# Altium PCB CH32H417QEU-R1.PcbDoc (part 5 of 6)
Units mil, origin at the board's own origin, x right, y up, seen from the top; angles counter-clockwise.
Board outline 4921.26 x 3346.46 mil, 4 copper layers (Top Layer, Layer 1, Layer 2, Bottom Layer), stack 23.756 mil thick; 271 components, 257 nets, 1065 pads, 927 vias.
Unrouted connection lines stored in the file: 149.
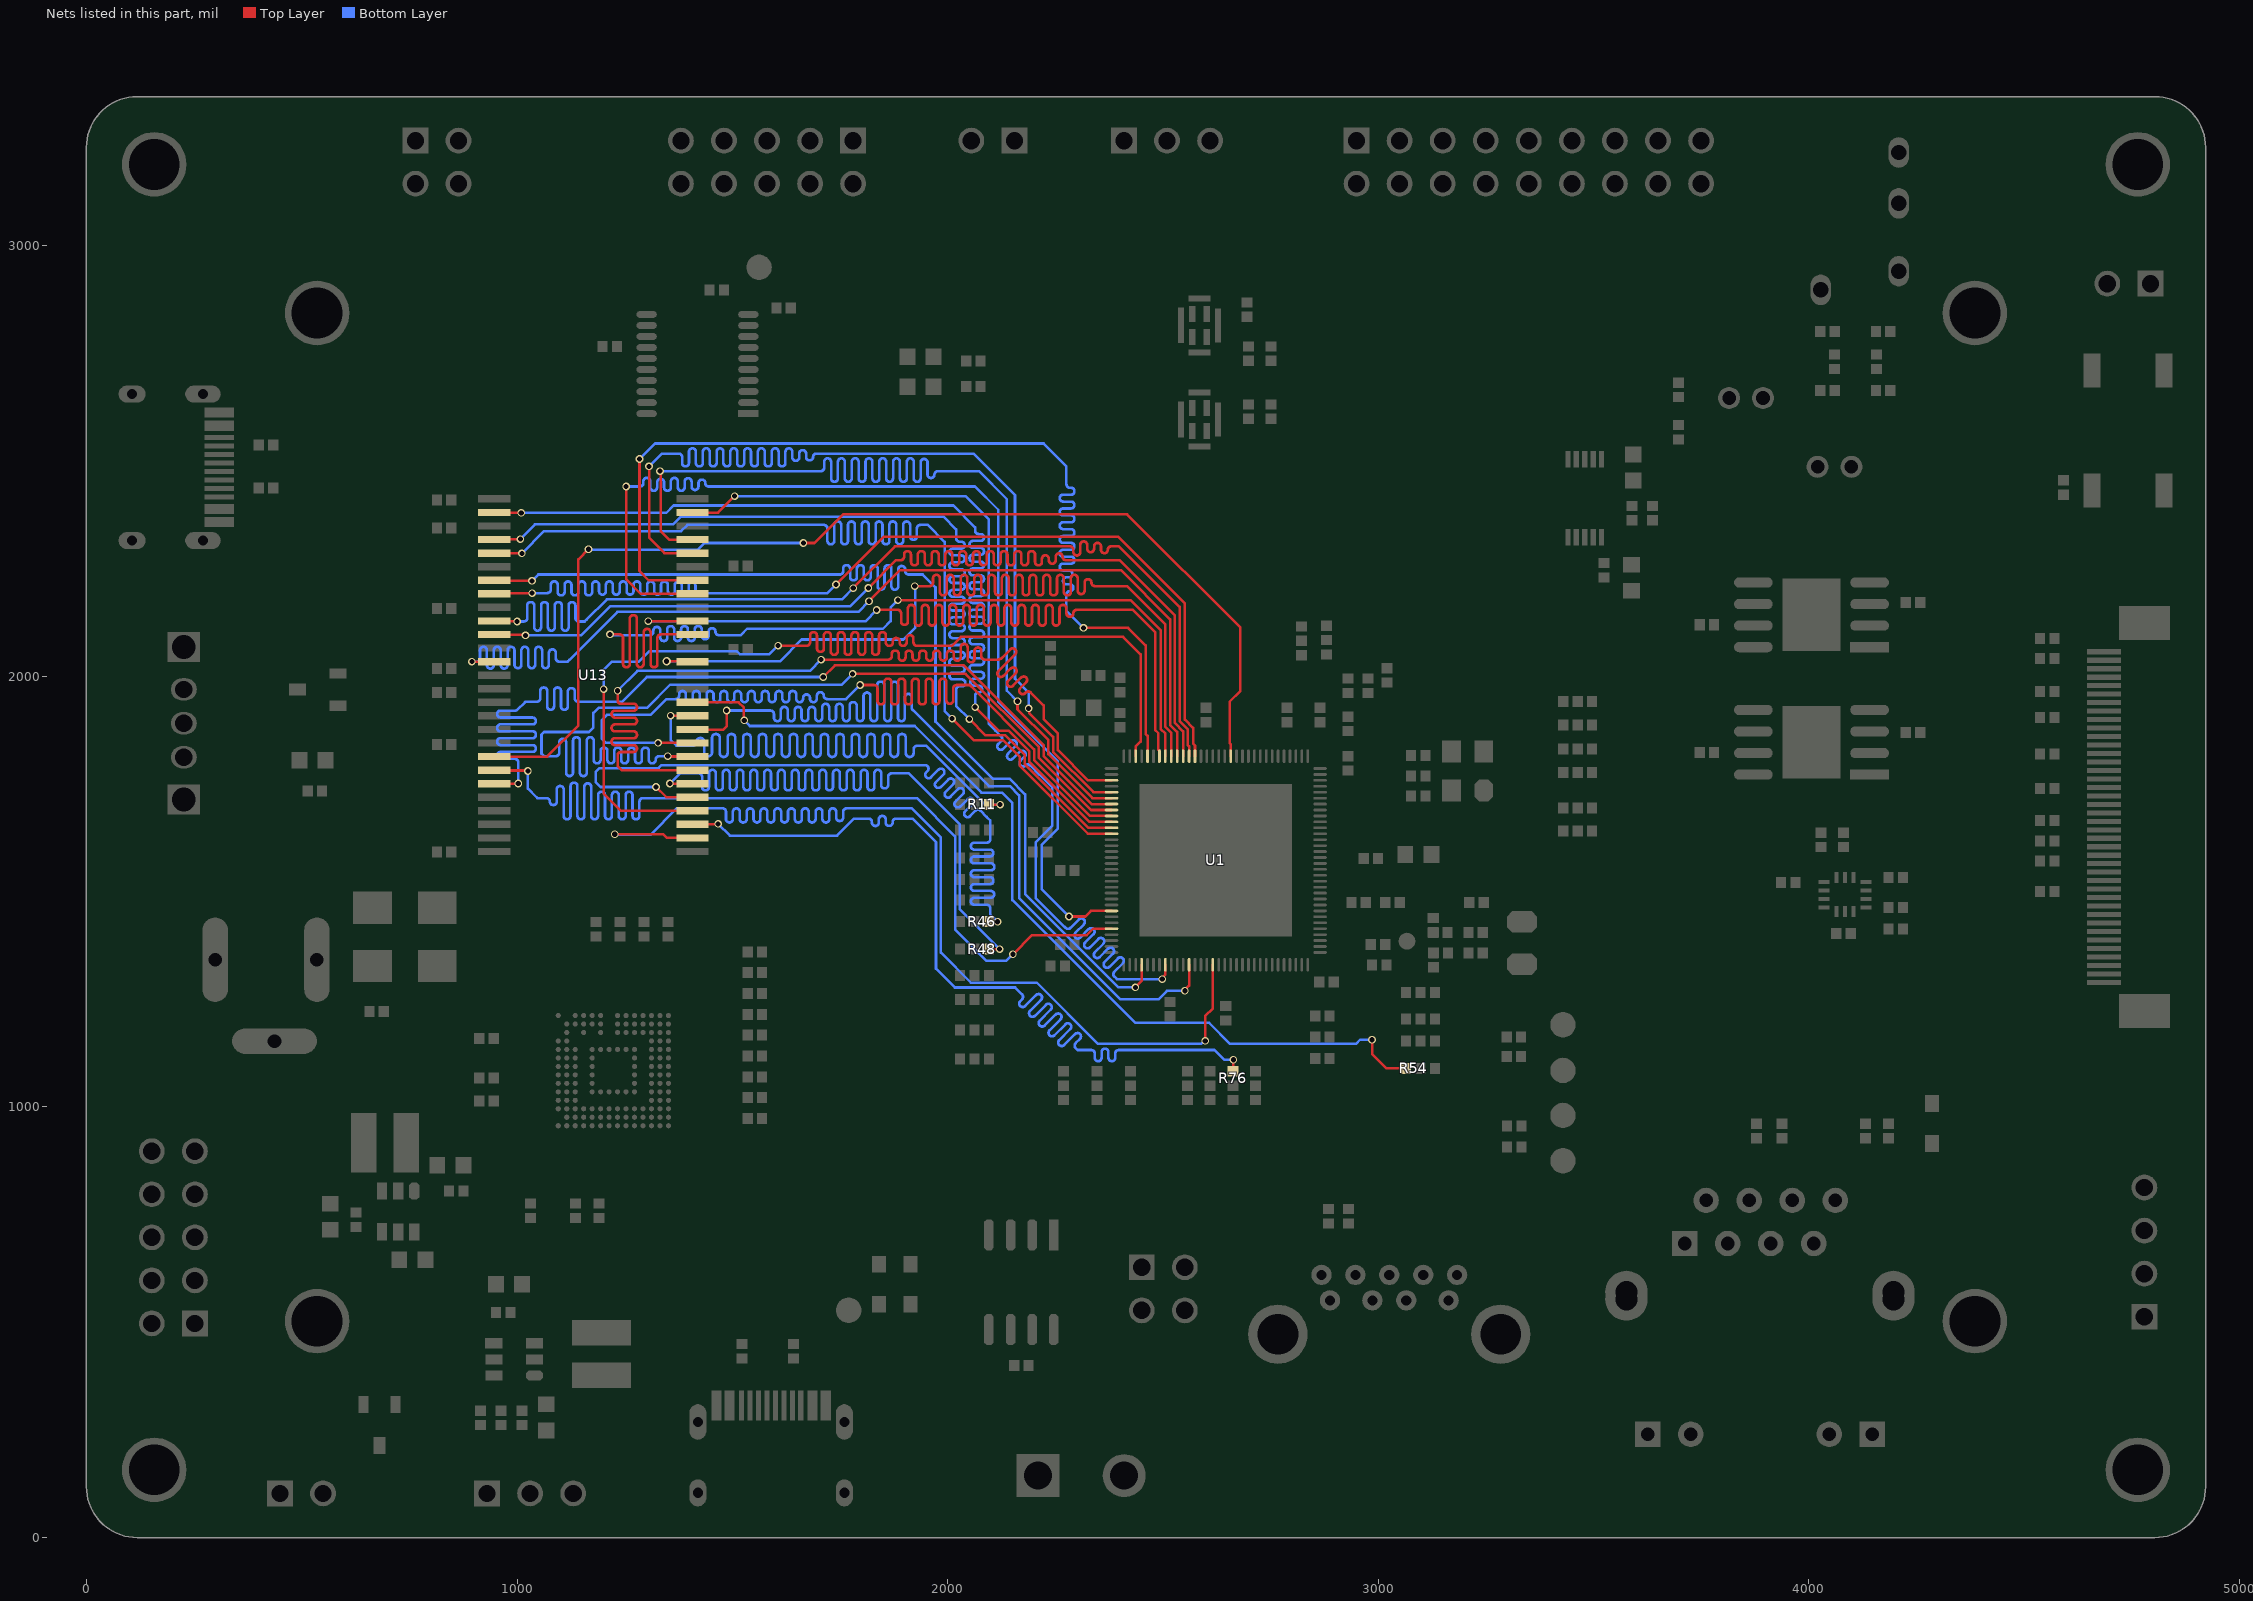
[diagram p7: the nets of this part, all layers, seen from the top]

## Via types
v1: diameter 17.72, hole 11.81, Top Layer to Bottom Layer, tented both sides, 558 vias
v2: diameter 19.68, hole 11.81, Top Layer to Bottom Layer, tented both sides, 320 vias
v3: diameter 28, hole 16, Top Layer to Bottom Layer, tented both sides, 24 vias
v4: diameter 20, hole 12, Top Layer to Bottom Layer, tented both sides, 22 vias
v5: diameter 27.56, hole 15.75, Top Layer to Bottom Layer, tented both sides, 3 vias

## Nets (pads, with @x,y where several pads share a name; then routed paths per layer and width w, separated by ;. In a path a pad name is that pad's centre, name@x,y a point inside that pad or via, vN(x,y) a via of type N, cw(c..) or ccw(c..) an arc to the next point about the centre after c; other vN are vias at no path point) (continued)
SDRAM_A4: U1.112 U13.29 | length 2610.3
  Top Layer w6: v1(1226.94,1633.39) 1227.31,1633.02 1339.76,1633.02 1347.96,1624.81 U13.29@1407.4,1624.81 ; v1(2598.17,1153.73) 2598.17,1211.58 2615.8,1229.21 U1.112@2615.8,1330.38
  Bottom Layer w6: v1(1226.94,1633.39) 1228.27,1632.06 1309.51,1632.06 1370.85,1693.4 1458.25,1693.4 1477.25,1693.4 cw(c1477.25,1685.4) 1485.25,1685.4 1485.25,1668.66 ccw(c1493.25,1668.66) 1501.25,1668.66 1501.25,1685.4 cw(c1509.25,1685.4) 1517.25,1685.4 1517.25,1668.66 ccw(c1525.25,1668.66) 1533.25,1668.66 1533.25,1685.4 cw(c1541.25,1685.4) 1549.25,1685.4 1549.25,1668.66 ccw(c1557.25,1668.66) 1565.25,1668.66 1565.25,1685.4 cw(c1573.25,1685.4) 1581.25,1685.4 1581.25,1668.66 ccw(c1589.25,1668.66) 1597.25,1668.66 1597.25,1685.4 cw(c1605.25,1685.4) 1613.25,1685.4 1613.25,1668.66 ccw(c1621.25,1668.66) 1629.25,1668.66 1629.25,1685.4 cw(c1637.25,1685.4) 1645.25,1685.4 1645.25,1668.66 ccw(c1653.25,1668.66) 1661.25,1668.66 1661.25,1685.4 cw(c1669.25,1685.4) 1677.25,1685.4 1677.25,1668.66 ccw(c1685.25,1668.66) 1693.25,1668.66 1693.25,1685.4 cw(c1701.25,1685.4) 1709.25,1685.4 1709.25,1668.66 ccw(c1717.25,1668.66) 1725.25,1668.66 1725.25,1685.4 cw(c1733.25,1685.4) 1741.25,1685.4 1741.25,1672.09 ccw(c1749.25,1672.09) 1757.25,1672.09 1757.25,1685.4 cw(c1765.25,1685.4) 1765.25,1693.4 1793.54,1693.4 1916.83,1693.4 1984.05,1626.18 1984.05,1358.53 2054.06,1288.52 2207.12,1288.52 2349.19,1146.46 2588.8,1146.46 2596.07,1153.73 v1(2598.17,1153.73)
SDRAM_A5: R76.1 U13.30 | length 2296
  Top Layer w6: U13.30@1407.4,1656.31 1408.03,1656.94 1466.48,1656.94 v1(1467.11,1657.58) ; R76.1@2662.33,1082.95 2663.58,1084.19 v1(2663.58,1109.78)
  Bottom Layer w6: v1(1467.11,1657.58) 1494.68,1630.01 1743.26,1630.01 1782.84,1669.59 1797.2,1669.59 1816.2,1669.59 cw(c1816.2,1661.59) 1824.2,1661.59 1824.2,1660.53 ccw(c1832.2,1660.53) 1840.2,1660.53 1840.2,1667.9 cw(c1848.2,1667.9) 1856.2,1667.9 1856.2,1660.78 ccw(c1864.2,1660.78) 1872.2,1660.78 1872.2,1661.59 cw(c1880.2,1661.59) 1880.2,1669.59 1901.49,1669.59 1918.54,1669.59 1973.05,1615.07 1973.05,1321.32 2016.85,1277.52 2122.66,1277.52 2156.57,1277.52 2172.85,1261.24 cw(c2167.19,1255.59) 2172.85,1249.93 2168.71,1245.8 ccw(c2174.37,1240.14) 2168.71,1234.48 ccw(c2174.37,1240.14) 2180.03,1234.48 2205.51,1259.97 cw(c2211.17,1254.31) 2216.82,1259.97 cw(c2211.17,1254.31) 2216.82,1248.65 2191.34,1223.17 ccw(c2197,1217.51) 2191.34,1211.86 ccw(c2197,1217.51) 2202.65,1211.86 2228.14,1237.34 cw(c2233.8,1231.68) 2239.45,1237.34 cw(c2233.8,1231.68) 2239.45,1226.03 2213.97,1200.54 ccw(c2219.63,1194.88) 2213.97,1189.23 ccw(c2219.63,1194.88) 2225.28,1189.23 2250.77,1214.71 cw(c2256.42,1209.05) 2262.08,1214.71 cw(c2256.42,1209.05) 2262.08,1203.4 2236.6,1177.91 ccw(c2242.25,1172.26) 2236.6,1166.6 ccw(c2242.25,1172.26) 2247.91,1166.6 2273.39,1192.08 cw(c2279.05,1186.43) 2284.71,1192.08 cw(c2279.05,1186.43) 2284.71,1180.77 2259.22,1155.29 ccw(c2264.88,1149.63) 2259.22,1143.97 ccw(c2264.88,1149.63) 2270.54,1143.97 2296.02,1169.46 cw(c2301.68,1163.8) 2307.33,1169.46 cw(c2301.68,1163.8) 2307.33,1158.14 2297.3,1148.11 ccw(c2302.95,1142.45) 2297.3,1136.79 2301.81,1132.28 2314.43,1132.28 2333.43,1132.28 cw(c2333.43,1124.28) 2341.43,1124.28 2341.43,1114.39 ccw(c2349.43,1114.39) 2357.43,1114.39 2357.43,1127.46 cw(c2365.43,1127.46) 2373.43,1127.46 2373.43,1114.39 ccw(c2381.43,1114.39) 2389.43,1114.39 2389.43,1124.28 cw(c2397.43,1124.28) 2397.43,1132.28 2447.67,1132.28 2619.47,1132.28 2641.97,1109.78 v1(2663.58,1109.78)
SDRAM_A6: U1.62 U13.31 | length 2608
  Top Layer w6: v1(1201.03,1970.49) 1201.03,1727.88 1241.11,1687.81 U13.31@1407.4,1687.81 ; v1(1606.5,2071.41) 1606.93,2070.98 1669.59,2070.98 1672.6,2070.98 ccw(c1672.6,2078.98) 1680.6,2078.98 1680.6,2094.79 cw(c1688.6,2094.79) 1696.6,2094.79 1696.6,2064.83 ccw(c1704.6,2064.83) 1712.6,2064.83 1712.6,2094.79 cw(c1720.6,2094.79) 1728.6,2094.79 1728.6,2057.98 ccw(c1736.6,2057.98) 1744.6,2057.98 1744.6,2094.79 cw(c1752.6,2094.79) 1760.6,2094.79 1760.6,2057.98 ccw(c1768.6,2057.98) 1776.6,2057.98 1776.6,2094.79 cw(c1784.6,2094.79) 1792.6,2094.79 1792.6,2057.98 ccw(c1800.6,2057.98) 1808.6,2057.98 1808.6,2094.79 cw(c1816.6,2094.79) 1824.6,2094.79 1824.6,2057.98 ccw(c1832.6,2057.98) 1840.6,2057.98 1840.6,2094.79 cw(c1848.6,2094.79) 1856.6,2094.79 1856.6,2078.71 ccw(c1864.6,2078.71) 1872.6,2078.71 1872.6,2081.11 cw(c1880.6,2081.11) 1888.6,2081.11 1888.6,2078.71 ccw(c1896.6,2078.71) 1904.6,2078.71 1904.6,2087.96 cw(c1912.6,2087.96) 1920.6,2087.96 1920.6,2078.98 ccw(c1928.6,2078.98) 1928.6,2070.98 1965.57,2070.98 2010.37,2070.98 2030.95,2091.56 2407.16,2091.56 2448.02,2050.7 2448.02,1848.38 2436.67,1837.03 U1.62@2436.67,1814.64
  Bottom Layer w6: v1(1201.03,1970.49) 1201.03,2015 1220.07,2034.04 1283.01,2034.04 1307.71,2058.74 1510.18,2058.74 1517.23,2051.69 1586.16,2051.69 v1@1606.19,2071.72
SDRAM_A7: R46.1 U13.32 | length 2255.1
  Top Layer w6: v1(1322.85,1743.16) 1346.7,1719.3 U13.32@1407.4,1719.3 ; R46.1@2095.96,1430.46 2096.23,1430.19 v1(2116.23,1430.19)
  Bottom Layer w6: v1(1322.85,1743.16) 1193.84,1743.16 1182.96,1754.04 1182.96,1778.55 1191.46,1787.05 1328.74,1787.05 1335.61,1793.93 1934.4,1793.93 1947.61,1793.93 cw(c1947.61,1785.93) 1953.27,1780.27 1950.16,1777.16 ccw(c1955.81,1771.5) 1950.16,1765.85 ccw(c1955.81,1771.5) 1961.47,1765.84 1978.94,1783.31 cw(c1984.59,1777.66) 1990.25,1783.31 cw(c1984.6,1777.65) 1990.25,1772 1972.79,1754.53 ccw(c1978.44,1748.87) 1972.79,1743.22 ccw(c1978.44,1748.87) 1984.1,1743.22 2001.57,1760.68 cw(c2007.22,1755.03) 2012.88,1760.68 cw(c2007.22,1755.03) 2012.88,1749.37 1995.41,1731.9 ccw(c2001.07,1726.25) 1995.41,1720.59 ccw(c2001.07,1726.25) 2006.73,1720.59 2024.19,1738.06 cw(c2029.85,1732.4) 2035.51,1738.06 cw(c2029.85,1732.4) 2035.51,1726.74 2018.04,1709.28 ccw(c2023.7,1703.62) 2018.04,1697.96 ccw(c2023.7,1703.62) 2029.35,1697.96 2046.82,1715.43 cw(c2052.48,1709.77) 2058.13,1715.43 cw(c2052.48,1709.77) 2058.13,1704.12 2040.67,1686.65 ccw(c2046.32,1680.99) 2040.67,1675.34 ccw(c2046.32,1680.99) 2051.98,1675.34 2064.9,1688.25 cw(c2070.55,1682.6) 2076.21,1688.25 2090.54,1673.92 2098.96,1665.5 2098.96,1640.73 2098.96,1621.73 cw(c2090.96,1621.73) 2090.96,1613.73 2061.96,1613.73 ccw(c2061.96,1605.73) 2061.96,1597.73 2098.13,1597.73 cw(c2098.13,1589.73) 2098.13,1581.73 2061.96,1581.73 ccw(c2061.96,1573.73) 2061.96,1565.73 2100.51,1565.73 cw(c2100.51,1557.73) 2100.51,1549.73 2061.96,1549.73 ccw(c2061.96,1541.73) 2061.96,1533.73 2098.39,1533.73 cw(c2098.39,1525.73) 2098.39,1517.73 2061.96,1517.73 ccw(c2061.96,1509.73) 2061.96,1501.73 2100.1,1501.73 cw(c2100.1,1493.73) 2100.1,1485.73 2061.96,1485.73 ccw(c2061.96,1477.73) 2061.96,1469.73 2090.96,1469.73 cw(c2090.96,1461.73) 2098.96,1461.73 2098.96,1447.46 2109.92,1436.5 v1(2116.23,1430.19)
SDRAM_A8: R48.1 U13.33 | length 2255.4
  Top Layer w6: v1(1354.89,1751.08) 1355.03,1750.94 1407.26,1750.94 U13.33@1407.4,1750.8 ; R48.1@2095.96,1366.35 2096.04,1366.42 v1(2120.82,1366.42)
  Bottom Layer w6: v1(1354.89,1751.08) 1378.46,1774.64 1402.8,1774.64 1421.8,1774.64 cw(c1421.8,1766.64) 1429.8,1766.64 1429.8,1743.24 ccw(c1437.8,1743.24) 1445.8,1743.24 1445.8,1774.93 cw(c1453.8,1774.93) 1461.8,1774.93 1461.8,1743.24 ccw(c1469.8,1743.24) 1477.8,1743.24 1477.8,1774.93 cw(c1485.8,1774.93) 1493.8,1774.93 1493.8,1743.24 ccw(c1501.8,1743.24) 1509.8,1743.24 1509.8,1774.93 cw(c1517.8,1774.93) 1525.8,1774.93 1525.8,1743.24 ccw(c1533.8,1743.24) 1541.8,1743.24 1541.8,1774.93 cw(c1549.8,1774.93) 1557.8,1774.93 1557.8,1743.24 ccw(c1565.8,1743.24) 1573.8,1743.24 1573.8,1774.93 cw(c1581.8,1774.93) 1589.8,1774.93 1589.8,1743.24 ccw(c1597.8,1743.24) 1605.8,1743.24 1605.8,1774.93 cw(c1613.8,1774.93) 1621.8,1774.93 1621.8,1743.24 ccw(c1629.8,1743.24) 1637.8,1743.24 1637.8,1774.93 cw(c1645.8,1774.93) 1653.8,1774.93 1653.8,1743.24 ccw(c1661.8,1743.24) 1669.8,1743.24 1669.8,1774.93 cw(c1677.8,1774.93) 1685.8,1774.93 1685.8,1743.24 ccw(c1693.8,1743.24) 1701.8,1743.24 1701.8,1774.93 cw(c1709.8,1774.93) 1717.8,1774.93 1717.8,1743.24 ccw(c1725.8,1743.24) 1733.8,1743.24 1733.8,1774.93 cw(c1741.8,1774.93) 1749.8,1774.93 1749.8,1743.24 ccw(c1757.8,1743.24) 1765.8,1743.24 1765.8,1774.93 cw(c1773.8,1774.93) 1781.8,1774.93 1781.8,1743.24 ccw(c1789.8,1743.24) 1797.8,1743.24 1797.8,1774.93 cw(c1805.8,1774.93) 1813.8,1774.93 1813.8,1743.24 ccw(c1821.8,1743.24) 1829.8,1743.24 1829.8,1774.93 cw(c1837.8,1774.93) 1845.8,1774.93 1845.8,1747.75 ccw(c1853.8,1747.75) 1861.8,1747.75 1861.8,1766.64 cw(c1869.8,1766.64) 1869.8,1774.64 1884.13,1774.64 1910.02,1774.64 2028.4,1656.26 2028.4,1458.76 2120.74,1366.42 v1(2120.82,1366.42)
SDRAM_A9: U1.67 U13.34 | length 2605.3
  Top Layer w6: v1(1233.56,1966.62) 1233.56,1958.16 1233.56,1944.38 ccw(c1241.56,1944.38) 1241.56,1936.38 1270.56,1936.38 cw(c1270.56,1928.38) 1270.56,1920.38 1227.44,1920.38 ccw(c1227.44,1912.38) 1227.44,1904.38 1270.56,1904.38 cw(c1270.56,1896.38) 1270.56,1888.38 1227.44,1888.38 ccw(c1227.44,1880.38) 1227.44,1872.38 1270.56,1872.38 cw(c1270.56,1864.38) 1270.56,1856.38 1227.44,1856.38 ccw(c1227.44,1848.38) 1227.44,1840.38 1270.56,1840.38 cw(c1270.56,1832.38) 1270.56,1824.38 1241.56,1824.38 ccw(c1241.56,1816.38) 1233.56,1816.38 1233.56,1797.38 1233.56,1791.54 1242.88,1782.21 U13.34@1407.4,1782.21 ; v1(1706.29,2038.98) 1859.3,2038.98 1862.3,2038.98 ccw(c1862.3,2046.98) 1870.3,2046.98 1870.3,2051.98 cw(c1878.3,2051.98) 1886.3,2051.98 1886.3,2044.46 ccw(c1894.3,2044.46) 1902.3,2044.46 1902.3,2051.98 cw(c1910.3,2051.98) 1918.3,2051.98 1918.3,2044.46 ccw(c1926.3,2044.46) 1934.3,2044.46 1934.3,2051.98 cw(c1942.3,2051.98) 1950.3,2051.98 1950.3,2044.46 ccw(c1958.3,2044.46) 1966.3,2044.46 1966.3,2051.98 cw(c1974.3,2051.98) 1982.3,2051.98 1982.3,2044.46 ccw(c1990.3,2044.46) 1998.3,2044.46 1998.3,2051.98 cw(c2006.3,2051.98) 2014.3,2051.98 2014.3,2044.46 ccw(c2022.3,2044.46) 2030.3,2044.46 2030.3,2067.35 cw(c2038.3,2067.35) 2046.3,2067.35 2046.3,2040.29 ccw(c2054.3,2040.29) 2062.3,2040.29 2062.3,2058.99 cw(c2070.3,2058.99) 2078.3,2058.99 2078.3,2046.98 ccw(c2086.3,2046.98) 2086.3,2038.98 2101.63,2038.98 2112.12,2038.98 2116.36,2038.98 ccw(c2116.36,2052.63) 2126,2042.96 2145.83,2062.79 cw(c2151.49,2057.13) 2157.15,2062.79 cw(c2151.49,2057.13) 2157.15,2051.47 2117.91,2012.24 ccw(c2123.57,2006.58) 2117.91,2000.93 ccw(c2123.57,2006.58) 2129.23,2000.93 2146.5,2018.2 cw(c2152.16,2012.55) 2157.82,2018.2 cw(c2152.16,2012.55) 2157.82,2006.89 2140.54,1989.61 ccw(c2146.2,1983.95) 2140.54,1978.3 ccw(c2146.2,1983.95) 2151.85,1978.3 2170.87,1997.32 cw(c2176.53,1991.66) 2182.19,1997.32 cw(c2176.53,1991.66) 2182.19,1986 2168.57,1972.39 ccw(c2174.23,1966.73) 2168.57,1961.07 ccw(c2174.23,1966.73) 2179.88,1961.07 2181.53,1962.72 cw(c2187.19,1957.07) 2192.85,1962.72 2222.79,1932.78 2222.79,1900.65 2255.84,1867.6 2255.84,1828.86 2326.16,1758.53 U1.67@2380.56,1758.53
  Bottom Layer w6: v1(1233.56,1966.62) 1279.69,2012.75 1680.07,2012.75 v1(1706.29,2038.98)
SDRAM_A10: U1.71 U13.22 | length 2610.4
  Top Layer w6: U13.22@947.4,1750.8 947.56,1750.96 1002.6,1750.96 v1(1002.77,1751.13) ; v1(1711.13,1998.51) 1738.08,2025.46 2037.57,2025.46 2222.84,1840.19 2222.84,1815.19 2334.61,1703.42 U1.71@2380.56,1703.42
  Bottom Layer w6: v1(1002.77,1751.13) 1002.77,1797.5 1002.77,1800.5 ccw(c994.77,1800.5) 994.77,1808.5 961.79,1808.5 cw(c961.79,1816.5) 961.79,1824.5 1035.79,1824.5 ccw(c1035.79,1832.5) 1035.79,1840.5 961.79,1840.5 cw(c961.79,1848.5) 961.79,1856.5 1035.79,1856.5 ccw(c1035.79,1864.5) 1035.79,1872.5 961.79,1872.5 cw(c961.79,1880.5) 961.79,1888.5 1035.79,1888.5 ccw(c1035.79,1896.5) 1035.79,1904.5 961.79,1904.5 cw(c961.79,1912.5) 961.79,1920.5 995.35,1920.5 ccw(c995.35,1928.5) 1001.01,1922.85 1018,1939.84 1019.06,1940.9 1043.07,1940.9 1046.07,1940.9 ccw(c1046.07,1948.9) 1054.07,1948.9 1054.07,1966.26 cw(c1062.07,1966.26) 1070.07,1966.26 1070.07,1930.4 ccw(c1078.07,1930.4) 1086.07,1930.4 1086.07,1966.26 cw(c1094.07,1966.26) 1102.07,1966.26 1102.07,1930.4 ccw(c1110.07,1930.4) 1118.07,1930.4 1118.07,1964.79 cw(c1126.07,1964.79) 1134.07,1964.79 1134.07,1948.9 ccw(c1142.07,1948.9) 1142.07,1940.9 1176.25,1940.9 1243.78,1940.9 1301.39,1998.51 v1(1711.13,1998.51)
SDRAM_A11: U1.72 U13.35 | length 2609.6
  Top Layer w6: v1@1350.06,1813.91 U13.35@1407.52,1813.91 ; v1(1779.4,2005.88) 2041.58,2005.88 2211.84,1835.61 2211.84,1810.63 2332.84,1689.64 U1.72@2380.56,1689.64
  Bottom Layer w6: v1(1350.06,1814.72) 1332.99,1814.72 1329.99,1814.72 ccw(c1329.99,1806.72) 1321.99,1806.72 1321.99,1806.05 cw(c1313.99,1806.05) 1305.99,1806.05 1305.99,1826.58 ccw(c1297.99,1826.58) 1289.99,1826.58 1289.99,1806.05 cw(c1281.99,1806.05) 1273.99,1806.05 1273.99,1826.58 ccw(c1265.99,1826.58) 1257.99,1826.58 1257.99,1806.05 cw(c1249.99,1806.05) 1241.99,1806.05 1241.99,1826.58 ccw(c1233.99,1826.58) 1225.99,1826.58 1225.99,1806.05 cw(c1217.99,1806.05) 1209.99,1806.05 1209.99,1826.58 ccw(c1201.99,1826.58) 1193.99,1826.58 1193.99,1806.05 cw(c1185.99,1806.05) 1177.99,1806.05 1177.99,1850.79 ccw(c1169.99,1850.79) 1161.99,1850.79 1161.99,1776.45 cw(c1153.99,1776.45) 1145.99,1776.45 1145.99,1850.79 ccw(c1137.99,1850.79) 1129.99,1850.79 1129.99,1776.45 cw(c1121.99,1776.45) 1113.99,1776.45 1113.99,1847.14 ccw(c1105.99,1847.14) 1097.99,1847.14 1097.99,1822.72 cw(c1089.99,1822.72) 1089.99,1814.72 1065.02,1814.72 1062.71,1814.72 1056.92,1820.5 1056.92,1864.73 1062.98,1870.79 1167.21,1870.79 1177.5,1881.08 1177.5,1915.01 1189.98,1927.49 1302.7,1927.49 1355.85,1980.65 1754.17,1980.65 v1(1779.4,2005.88)
SDRAM_A12: U1.73 U13.36 | length 2605.3
  Top Layer w6: v1(1327.73,1845.58) 1327.88,1845.43 1407.25,1845.43 U13.36@1407.4,1845.29 ; v1(1796.82,1979.93) 1810.04,1979.93 1829.04,1979.93 cw(c1829.04,1971.93) 1837.04,1971.93 1837.04,1942.93 ccw(c1845.04,1942.93) 1853.04,1942.93 1853.04,1986.88 cw(c1861.04,1986.88) 1869.04,1986.88 1869.04,1942.93 ccw(c1877.04,1942.93) 1885.04,1942.93 1885.04,1986.88 cw(c1893.04,1986.88) 1901.04,1986.88 1901.04,1942.93 ccw(c1909.04,1942.93) 1917.04,1942.93 1917.04,1986.88 cw(c1925.04,1986.88) 1933.04,1986.88 1933.04,1942.93 ccw(c1941.04,1942.93) 1949.04,1942.93 1949.04,1986.88 cw(c1957.04,1986.88) 1965.04,1986.88 1965.04,1942.93 ccw(c1973.04,1942.93) 1981.04,1942.93 1981.04,1986.88 cw(c1989.04,1986.88) 1997.04,1986.88 1997.04,1944.32 ccw(c2005.04,1944.32) 2013.04,1944.32 2013.04,1971.93 cw(c2021.04,1971.93) 2021.04,1979.93 2051.44,1979.93 2054.12,1977.25 2200.84,1830.53 2200.84,1806.08 2331.06,1675.86 U1.73@2380.56,1675.86
  Bottom Layer w6: v1(1327.73,1845.58) 1206.44,1845.58 1196.32,1855.7 1196.32,1897.82 1209.04,1910.54 1309.89,1910.54 1346.66,1947.31 1365.28,1947.31 1368.28,1947.31 ccw(c1368.28,1955.31) 1376.28,1955.31 1376.28,1958.13 cw(c1384.28,1958.13) 1392.28,1958.13 1392.28,1948.13 ccw(c1400.28,1948.13) 1408.28,1948.13 1408.28,1958.13 cw(c1416.28,1958.13) 1424.28,1958.13 1424.28,1948.13 ccw(c1432.28,1948.13) 1440.28,1948.13 1440.28,1958.13 cw(c1448.28,1958.13) 1456.28,1958.13 1456.28,1948.13 ccw(c1464.28,1948.13) 1472.28,1948.13 1472.28,1958.13 cw(c1480.28,1958.13) 1488.28,1958.13 1488.28,1948.13 ccw(c1496.28,1948.13) 1504.28,1948.13 1504.28,1958.13 cw(c1512.28,1958.13) 1520.28,1958.13 1520.28,1948.13 ccw(c1528.28,1948.13) 1536.28,1948.13 1536.28,1958.13 cw(c1544.28,1958.13) 1552.28,1958.13 1552.28,1948.13 ccw(c1560.28,1948.13) 1568.28,1948.13 1568.28,1958.13 cw(c1576.28,1958.13) 1584.28,1958.13 1584.28,1948.13 ccw(c1592.28,1948.13) 1600.28,1948.13 1600.28,1958.13 cw(c1608.28,1958.13) 1616.28,1958.13 1616.28,1948.13 ccw(c1624.28,1948.13) 1632.28,1948.13 1632.28,1958.13 cw(c1640.28,1958.13) 1648.28,1958.13 1648.28,1948.13 ccw(c1656.28,1948.13) 1664.28,1948.13 1664.28,1950.12 cw(c1672.28,1950.12) 1680.28,1950.12 1680.28,1948.13 ccw(c1688.28,1948.13) 1696.28,1948.13 1696.28,1955.31 cw(c1704.28,1955.31) 1712.28,1955.31 ccw(c1720.28,1955.31) 1720.28,1947.31 1737.22,1947.31 1764.21,1947.31 v1(1796.82,1979.93)
SDRAM_BA0: U1.46 U13.20 | length 2610.6
  Top Layer w6: U13.20@947.4,1813.79 1070.1,1813.79 1142.28,1885.97 1142.28,2271.45 v1(1166.07,2295.24) ; v1(1664.87,2309.74) 1690.89,2309.74 1757.42,2376.27 2416.69,2376.27 2679.84,2113.12 2679.84,1965.88 2655.09,1941.12 2655.09,1844.24 2657.14,1842.19 U1.46@2657.14,1814.64
  Bottom Layer w6: v1(1166.07,2295.24) 1167.05,2294.26 1420.07,2294.26 1435.55,2309.74 v1(1664.87,2309.74)
SDRAM_BA1: U1.92 U13.21 | length 2610.7
  Top Layer w6: U13.21@947.4,1782.29 948.36,1781.33 1024.06,1781.33 v1(1025.02,1780.37) ; v1(2151.49,1354.64) 2195.77,1398.92 2323.02,1398.92 2338.15,1414.05 U1.92@2380.56,1414.05
  Bottom Layer w6: v1(1025.02,1780.37) 1025.02,1739.7 1045.81,1718.91 1047.53,1717.19 1068.25,1717.19 cw(c1068.25,1709.19) 1076.25,1709.19 ccw(c1084.25,1709.19) 1092.25,1709.19 1092.25,1737.39 cw(c1100.25,1737.39) 1108.25,1737.39 1108.25,1676.04 ccw(c1116.25,1676.04) 1124.25,1676.04 1124.25,1745.34 cw(c1132.25,1745.34) 1140.25,1745.34 1140.25,1676.04 ccw(c1148.25,1676.04) 1156.25,1676.04 1156.25,1743.52 cw(c1164.25,1743.52) 1172.25,1743.52 1172.25,1676.04 ccw(c1180.25,1676.04) 1188.25,1676.04 1188.25,1724.16 cw(c1196.25,1724.16) 1204.25,1724.16 1204.25,1676.04 ccw(c1212.25,1676.04) 1220.25,1676.04 1220.25,1724.16 cw(c1228.25,1724.16) 1236.25,1724.16 1236.25,1676.04 ccw(c1244.25,1676.04) 1252.25,1676.04 1252.25,1724.16 cw(c1260.25,1724.16) 1268.25,1724.16 1268.25,1676.04 ccw(c1276.25,1676.04) 1284.25,1676.04 1284.25,1709.19 cw(c1292.25,1709.19) 1292.25,1717.19 1295.25,1717.19 1928.85,1717.19 2017.4,1628.63 2017.4,1411.83 2089.18,1340.05 2136.58,1340.05 2151.16,1354.64 v1(2151.49,1354.64)
SDRAM_D0: U1.74 U13.2 | length 2610.5
  Top Layer w6: U13.2@947.4,2380.72 947.93,2380.18 1009.28,2380.18 v1(1009.81,2379.64) ; v1(2063.87,1928.5) 2118.55,1873.83 2141.71,1873.83 2189.84,1825.7 2189.84,1801.52 2329.28,1662.08 U1.74@2380.56,1662.08
  Bottom Layer w6: v1(1009.81,2379.64) 1346.52,2379.64 1363.7,2396.82 2013.23,2396.82 2063.87,2346.17 2063.87,2341.47 2063.87,2338.47 ccw(c2071.87,2338.47) 2071.87,2330.47 2076.5,2330.47 cw(c2076.5,2322.47) 2076.5,2314.47 2058.7,2314.47 ccw(c2058.7,2306.47) 2058.7,2298.47 2076.5,2298.47 cw(c2076.5,2290.47) 2076.5,2282.47 2058.7,2282.47 ccw(c2058.7,2274.47) 2058.7,2266.47 2076.5,2266.47 cw(c2076.5,2258.47) 2076.5,2250.47 2058.7,2250.47 ccw(c2058.7,2242.47) 2058.7,2234.47 2076.5,2234.47 cw(c2076.5,2226.47) 2076.5,2218.47 2058.7,2218.47 ccw(c2058.7,2210.47) 2058.7,2202.47 2076.5,2202.47 cw(c2076.5,2194.47) 2076.5,2186.47 2058.7,2186.47 ccw(c2058.7,2178.47) 2058.7,2170.47 2076.5,2170.47 cw(c2076.5,2162.47) 2076.5,2154.47 2058.7,2154.47 ccw(c2058.7,2146.47) 2058.7,2138.47 2076.5,2138.47 cw(c2076.5,2130.47) 2076.5,2122.47 2058.7,2122.47 ccw(c2058.7,2114.47) 2058.7,2106.47 2076.5,2106.47 cw(c2076.5,2098.47) 2076.5,2090.47 2058.7,2090.47 ccw(c2058.7,2082.47) 2058.7,2074.47 2076.5,2074.47 cw(c2076.5,2066.47) 2076.5,2058.47 2058.7,2058.47 ccw(c2058.7,2050.47) 2058.7,2042.47 2076.5,2042.47 cw(c2076.5,2034.47) 2076.5,2026.47 2058.7,2026.47 ccw(c2058.7,2018.47) 2058.7,2010.47 2076.5,2010.47 cw(c2076.5,2002.47) 2076.5,1994.47 2060.76,1994.47 ccw(c2060.76,1986.47) 2060.76,1978.47 2071.87,1978.47 cw(c2071.87,1970.47) 2071.87,1962.47 ccw(c2071.87,1954.47) 2063.87,1954.47 2063.87,1941.79 v1(2063.87,1928.5)
SDRAM_D1: U1.75 U13.4 | length 2610.5
  Top Layer w6: U13.4@947.4,2317.73 947.91,2318.24 1007.23,2318.24 v1(1007.75,2318.76) ; v1(2050.54,1900.62) 2088.33,1862.83 2134.08,1862.83 2178.84,1818.06 2178.84,1796.96 2327.51,1648.3 U1.75@2380.56,1648.3
  Bottom Layer w6: v1(1007.75,2318.76) 1041.81,2352.82 1362.62,2352.82 1380.57,2370.78 1990.36,2370.78 2019.65,2341.48 2019.65,2323.89 2019.65,2320.88 ccw(c2027.65,2320.88) 2027.65,2312.88 2031.7,2312.88 cw(c2031.7,2304.88) 2031.7,2296.88 2012.11,2296.88 ccw(c2012.11,2288.88) 2012.11,2280.88 2031.7,2280.88 cw(c2031.7,2272.88) 2031.7,2264.88 2012.11,2264.88 ccw(c2012.11,2256.88) 2012.11,2248.88 2031.7,2248.88 cw(c2031.7,2240.88) 2031.7,2232.88 2012.11,2232.88 ccw(c2012.11,2224.88) 2012.11,2216.88 2031.7,2216.88 cw(c2031.7,2208.88) 2031.7,2200.88 2012.11,2200.88 ccw(c2012.11,2192.88) 2012.11,2184.88 2031.7,2184.88 cw(c2031.7,2176.88) 2031.7,2168.88 2012.11,2168.88 ccw(c2012.11,2160.88) 2012.11,2152.88 2031.7,2152.88 cw(c2031.7,2144.88) 2031.7,2136.88 2012.11,2136.88 ccw(c2012.11,2128.88) 2012.11,2120.88 2031.7,2120.88 cw(c2031.7,2112.88) 2031.7,2104.88 2012.11,2104.88 ccw(c2012.11,2096.88) 2012.11,2088.88 2031.7,2088.88 cw(c2031.7,2080.88) 2031.7,2072.88 2012.11,2072.88 ccw(c2012.11,2064.88) 2012.11,2056.88 2031.7,2056.88 cw(c2031.7,2048.88) 2031.7,2040.88 2012.11,2040.88 ccw(c2012.11,2032.88) 2012.11,2024.88 2031.7,2024.88 cw(c2031.7,2016.88) 2031.7,2008.88 2012.11,2008.88 ccw(c2012.11,2000.88) 2012.11,1992.88 2033.11,1992.88 cw(c2033.11,1984.88) 2033.11,1976.88 2027.65,1976.88 ccw(c2027.65,1968.88) 2019.65,1968.88 2019.65,1946.15 2019.65,1931.51 v1(2050.54,1900.62)
SDRAM_D2: U1.76 U13.5 | length 2610.4
  Top Layer w6: U13.5@947.4,2286.23 947.64,2285.99 1011.12,2285.99 v1(1011.36,2285.74) ; v1(2010.32,1901.96) 2060.46,1851.83 2128.72,1851.83 2167.84,1812.7 2167.84,1792.41 2325.73,1634.52 U1.76@2380.56,1634.52
  Bottom Layer w6: v1(1011.36,2285.74) 1063,2337.38 1381.34,2337.38 1395.61,2351.65 1693.69,2351.65 1712.69,2351.65 cw(c1712.69,2343.65) 1720.69,2343.65 1720.69,2314.65 ccw(c1728.69,2314.65) 1736.69,2314.65 1736.69,2351.78 cw(c1744.69,2351.78) 1752.69,2351.78 1752.69,2314.65 ccw(c1760.69,2314.65) 1768.69,2314.65 1768.69,2351.78 cw(c1776.69,2351.78) 1784.69,2351.78 1784.69,2314.65 ccw(c1792.69,2314.65) 1800.69,2314.65 1800.69,2351.78 cw(c1808.69,2351.78) 1816.69,2351.78 1816.69,2314.65 ccw(c1824.69,2314.65) 1832.69,2314.65 1832.69,2351.78 cw(c1840.69,2351.78) 1848.69,2351.78 1848.69,2314.65 ccw(c1856.69,2314.65) 1864.69,2314.65 1864.69,2351.78 cw(c1872.69,2351.78) 1880.69,2351.78 1880.69,2314.65 ccw(c1888.69,2314.65) 1896.69,2314.65 1896.69,2351.78 cw(c1904.69,2351.78) 1912.69,2351.78 1912.69,2325.13 ccw(c1920.69,2325.13) 1928.69,2325.13 1928.69,2343.65 cw(c1936.69,2343.65) 1936.69,2351.65 1949.07,2351.65 1953.95,2351.65 1993.11,2312.49 1993.11,1919.18 v1(2010.32,1901.96)
SDRAM_D3: U1.100 U13.7 | length 2610.6
  Top Layer w6: U13.7@947.4,2223.24 948.1,2222.54 1033.96,2222.54 v1(1034.66,2221.84) ; v1(2435.97,1277.89) 2435.97,1278.43 2450.44,1292.91 U1.100@2450.44,1330.38
  Bottom Layer w6: v1(1034.66,2221.84) 1049.38,2236.56 1746.38,2236.56 1749.38,2236.56 ccw(c1749.38,2244.56) 1757.38,2244.56 1757.38,2250.5 cw(c1765.38,2250.5) 1773.38,2250.5 1773.38,2230.79 ccw(c1781.38,2230.79) 1789.38,2230.79 1789.38,2250.5 cw(c1797.38,2250.5) 1805.38,2250.5 1805.38,2231.08 ccw(c1813.38,2231.08) 1821.38,2231.08 1821.38,2250.5 cw(c1829.38,2250.5) 1837.38,2250.5 1837.38,2209.35 ccw(c1845.38,2209.35) 1853.38,2209.35 1853.38,2250.5 cw(c1861.38,2250.5) 1869.38,2250.5 1869.38,2209.35 ccw(c1877.38,2209.35) 1885.38,2209.35 1885.38,2248.35 cw(c1893.38,2248.35) 1901.38,2248.35 1901.38,2244.56 ccw(c1909.38,2244.56) 1909.38,2236.56 1941.78,2236.56 1971.85,2206.48 1971.85,1894.91 2104.35,1762.41 2143.34,1762.41 2179.97,1725.79 2179.97,1494.54 2396.62,1277.89 v1(2435.97,1277.89)
SDRAM_D4: U1.52 U13.8 | length 2610.6
  Top Layer w6: U13.8@947.4,2191.74 948.25,2192.6 1034.23,2192.6 v1(1035.09,2193.46) ; v1(1740.8,2213.39) 1851.75,2324.34 2396.12,2324.34 2551.05,2169.4 2551.05,1899.47 2569.95,1880.58 2569.95,1843.57 2574.46,1839.05 U1.52@2574.46,1814.64
  Bottom Layer w6: v1(1035.09,2193.46) 1067.44,2193.46 1070.44,2193.46 ccw(c1070.44,2201.46) 1078.44,2201.46 1078.44,2212.49 cw(c1086.44,2212.49) 1094.44,2212.49 1094.44,2195.98 ccw(c1102.44,2195.98) 1110.44,2195.98 1110.44,2212.49 cw(c1118.44,2212.49) 1126.44,2212.49 1126.44,2195.98 ccw(c1134.44,2195.98) 1142.44,2195.98 1142.44,2212.49 cw(c1150.44,2212.49) 1158.44,2212.49 1158.44,2195.98 ccw(c1166.44,2195.98) 1174.44,2195.98 1174.44,2212.49 cw(c1182.44,2212.49) 1190.44,2212.49 1190.44,2197.67 ccw(c1198.44,2197.67) 1206.44,2197.67 1206.44,2212.49 cw(c1214.44,2212.49) 1222.44,2212.49 1222.44,2197.88 ccw(c1230.44,2197.88) 1238.44,2197.88 1238.44,2212.49 cw(c1246.44,2212.49) 1254.44,2212.49 1254.44,2197.88 ccw(c1262.44,2197.88) 1270.44,2197.88 1270.44,2212.49 cw(c1278.44,2212.49) 1286.44,2212.49 1286.44,2197.88 ccw(c1294.44,2197.88) 1302.44,2197.88 1302.44,2212.49 cw(c1310.44,2212.49) 1318.44,2212.49 1318.44,2197.88 ccw(c1326.44,2197.88) 1334.44,2197.88 1334.44,2212.49 cw(c1342.44,2212.49) 1350.44,2212.49 1350.44,2197.88 ccw(c1358.44,2197.88) 1366.44,2197.88 1366.44,2212.49 cw(c1374.44,2212.49) 1382.44,2212.49 1382.44,2197.88 ccw(c1390.44,2197.88) 1398.44,2197.88 1398.44,2210.66 cw(c1406.44,2210.66) 1414.44,2210.66 1414.44,2201.46 ccw(c1422.44,2201.46) 1422.44,2193.46 1471.51,2193.46 1720.87,2193.46 v1(1740.8,2213.39)
SDRAM_D5: U1.53 U13.10 | length 2610.5
  Top Layer w6: U13.10@947.4,2128.75 948.03,2128.11 999.6,2128.11 v1(1000.24,2127.47) ; v1(1780.75,2204.94) 1877.81,2301.99 2265.04,2301.99 2284.04,2301.99 cw(c2284.04,2293.99) 2292.04,2293.99 2292.04,2288.76 ccw(c2300.04,2288.76) 2308.04,2288.76 2308.04,2305.34 cw(c2316.04,2305.34) 2324.04,2305.34 2324.04,2296.28 ccw(c2332.04,2296.28) 2340.04,2296.28 2340.04,2301.99 cw(c2348.04,2301.99) 2356.04,2301.99 2356.04,2293.99 ccw(c2364.04,2293.99) 2372.04,2293.99 cw(c2380.04,2293.99) 2380.04,2301.99 2397.6,2301.99 2402.65,2296.95 2538.57,2161.03 2538.57,1896.4 2557.9,1877.06 2557.9,1840.06 2560.68,1837.28 U1.53@2560.68,1814.64
  Bottom Layer w6: v1(1000.24,2127.47) 1012.79,2127.47 1015.79,2127.47 ccw(c1015.79,2135.47) 1023.79,2135.47 1023.79,2164.47 cw(c1031.79,2164.47) 1039.79,2164.47 1039.79,2114.14 ccw(c1047.79,2114.14) 1055.79,2114.14 1055.79,2164.47 cw(c1063.79,2164.47) 1071.79,2164.47 1071.79,2114.14 ccw(c1079.79,2114.14) 1087.79,2114.14 1087.79,2164.47 cw(c1095.79,2164.47) 1103.79,2164.47 1103.79,2114.14 ccw(c1111.79,2114.14) 1119.79,2114.14 1119.79,2164.47 cw(c1127.79,2164.47) 1135.79,2164.47 1135.79,2135.47 ccw(c1143.79,2135.47) 1143.79,2127.47 1157.17,2127.47 1161.58,2131.88 1208.57,2178.88 1754.98,2178.88 1780.75,2204.65 v1(1780.75,2204.94)
SDRAM_D6: U1.54 U13.11 | length 2610.7
  Top Layer w6: U13.11@947.4,2097.22 948.44,2096.18 1018.58,2096.18 v1(1019.62,2095.14) ; v1(1816.04,2205.22) 1880.57,2269.76 1887.92,2269.76 1890.92,2269.76 ccw(c1890.92,2277.76) 1898.92,2277.76 1898.92,2282.99 cw(c1906.92,2282.99) 1914.92,2282.99 1914.92,2265.8 ccw(c1922.92,2265.8) 1930.92,2265.8 1930.92,2282.99 cw(c1938.92,2282.99) 1946.92,2282.99 1946.92,2265.8 ccw(c1954.92,2265.8) 1962.92,2265.8 1962.92,2282.99 cw(c1970.92,2282.99) 1978.92,2282.99 1978.92,2265.8 ccw(c1986.92,2265.8) 1994.92,2265.8 1994.92,2282.99 cw(c2002.92,2282.99) 2010.92,2282.99 2010.92,2265.8 ccw(c2018.92,2265.8) 2026.92,2265.8 2026.92,2282.99 cw(c2034.92,2282.99) 2042.92,2282.99 2042.92,2265.8 ccw(c2050.92,2265.8) 2058.92,2265.8 2058.92,2282.99 cw(c2066.92,2282.99) 2074.92,2282.99 2074.92,2265.8 ccw(c2082.92,2265.8) 2090.92,2265.8 2090.92,2282.99 cw(c2098.92,2282.99) 2106.92,2282.99 2106.92,2265.8 ccw(c2114.92,2265.8) 2122.92,2265.8 2122.92,2282.99 cw(c2130.92,2282.99) 2138.92,2282.99 2138.92,2265.8 ccw(c2146.92,2265.8) 2154.92,2265.8 2154.92,2282.99 cw(c2162.92,2282.99) 2170.92,2282.99 2170.92,2265.8 ccw(c2178.92,2265.8) 2186.92,2265.8 2186.92,2282.99 cw(c2194.92,2282.99) 2202.92,2282.99 2202.92,2265.8 ccw(c2210.92,2265.8) 2218.92,2265.8 2218.92,2273.05 cw(c2226.92,2273.05) 2234.92,2273.05 2234.92,2269.75 ccw(c2242.92,2269.75) 2250.92,2269.75 2250.92,2277.76 cw(c2258.92,2277.76) 2266.92,2277.76 ccw(c2274.92,2277.76) 2274.92,2269.76 2304.11,2269.76 2398.8,2269.76 2527.57,2140.99 2527.57,1891.84 2546.9,1872.51 U1.54@2546.9,1814.64
  Bottom Layer w6: v1(1019.62,2095.14) 1148.47,2095.14 1216.02,2162.69 1773.5,2162.69 v1(1816.04,2205.22)
SDRAM_D7: U1.55 U13.13 | length 2610.3
  Top Layer w6: v1(895.03,2034.15) 895.09,2034.2 947.34,2034.2 U13.13@947.4,2034.26 ; v1(1817.46,2174.49) 1889.76,2246.8 2402.27,2246.8 2516.57,2132.5 2516.57,1887.28 2533.12,1870.73 U1.55@2533.12,1814.64
  Bottom Layer w6: v1(895.03,2034.15) 903.11,2034.15 906.11,2034.15 ccw(c906.11,2042.15) 914.11,2042.15 914.11,2060.71 cw(c922.11,2060.71) 930.11,2060.71 930.11,2026.05 ccw(c938.11,2026.05) 946.11,2026.05 946.11,2060.71 cw(c954.11,2060.71) 962.11,2060.71 962.11,2026.05 ccw(c970.11,2026.05) 978.11,2026.05 978.11,2060.71 cw(c986.11,2060.71) 994.11,2060.71 994.11,2026.9 ccw(c1002.11,2026.9) 1010.11,2026.9 1010.11,2060.71 cw(c1018.11,2060.71) 1026.11,2060.71 1026.11,2026.9 ccw(c1034.11,2026.9) 1042.11,2026.9 1042.11,2060.71 cw(c1050.11,2060.71) 1058.11,2060.71 1058.11,2026.9 ccw(c1066.11,2026.9) 1074.11,2026.9 1074.11,2054.73 cw(c1082.11,2054.73) 1090.11,2054.73 1090.11,2042.15 ccw(c1098.11,2042.15) 1098.11,2034.15 1117.37,2034.15 1121.5,2038.28 1233.05,2149.83 1792.79,2149.83 v1(1817.46,2174.49)
SDRAM_D8: U1.56 U13.42 | length 2610.5
  Top Layer w6: v2(1347.52,2035.11) 1347.95,2034.68 1406.97,2034.68 U13.42@1407.4,2034.26 ; v1(1923.71,2209.68) 1954.99,2209.68 1957.99,2209.68 ccw(c1957.99,2217.68) 1965.99,2217.68 1965.99,2227.8 cw(c1973.99,2227.8) 1981.99,2227.8 1981.99,2195.98 ccw(c1989.99,2195.98) 1997.99,2195.98 1997.99,2227.8 cw(c2005.99,2227.8) 2013.99,2227.8 2013.99,2195.98 ccw(c2021.99,2195.98) 2029.99,2195.98 2029.99,2227.8 cw(c2037.99,2227.8) 2045.99,2227.8 2045.99,2195.98 ccw(c2053.99,2195.98) 2061.99,2195.98 2061.99,2227.8 cw(c2069.99,2227.8) 2077.99,2227.8 2077.99,2195.98 ccw(c2085.99,2195.98) 2093.99,2195.98 2093.99,2227.8 cw(c2101.99,2227.8) 2109.99,2227.8 2109.99,2195.98 ccw(c2117.99,2195.98) 2125.99,2195.98 2125.99,2227.8 cw(c2133.99,2227.8) 2141.99,2227.8 2141.99,2195.98 ccw(c2149.99,2195.98) 2157.99,2195.98 2157.99,2227.8 cw(c2165.99,2227.8) 2173.99,2227.8 2173.99,2195.98 ccw(c2181.99,2195.98) 2189.99,2195.98 2189.99,2227.8 cw(c2197.99,2227.8) 2205.99,2227.8 2205.99,2195.98 ccw(c2213.99,2195.98) 2221.99,2195.98 2221.99,2227.8 cw(c2229.99,2227.8) 2237.99,2227.8 2237.99,2195.98 ccw(c2245.99,2195.98) 2253.99,2195.98 2253.99,2227.8 cw(c2261.99,2227.8) 2269.99,2227.8 2269.99,2195.98 ccw(c2277.99,2195.98) 2285.99,2195.98 2285.99,2227.8 cw(c2293.99,2227.8) 2301.99,2227.8 2301.99,2199.07 ccw(c2309.99,2199.07) 2317.99,2199.07 2317.99,2217.68 cw(c2325.99,2217.68) 2333.99,2217.68 ccw(c2341.99,2217.68) 2341.99,2209.68 2376.75,2209.68 2415.97,2209.68 2505.57,2120.08 2505.57,1882.73 2519.34,1868.95 U1.56@2519.34,1814.64
  Bottom Layer w6: v2(1347.52,2035.11) 1347.87,2034.76 1610.35,2034.76 1661.15,2085.56 1897.34,2085.56 1925.13,2113.34 1925.13,2208.26 v1(1923.71,2209.68)
SDRAM_D9: U1.57 U13.44 | length 2610.4
  Top Layer w6: v1(1215.83,2097.54) 1215.98,2097.38 1219.12,2097.38 1238.12,2097.38 cw(c1238.12,2089.38) 1246.12,2089.38 1246.12,2029.12 ccw(c1254.12,2029.12) 1262.12,2029.12 1262.12,2134.38 cw(c1270.12,2134.38) 1278.12,2134.38 1278.12,2029.12 ccw(c1286.12,2029.12) 1294.12,2029.12 1294.12,2102.28 cw(c1302.12,2102.28) 1310.12,2102.28 1310.12,2029.12 ccw(c1318.12,2029.12) 1326.12,2029.12 1326.12,2089.38 cw(c1334.12,2089.38) 1334.12,2097.38 1351.08,2097.38 1407.24,2097.38 U13.44@1407.4,2097.22 ; v1(1884.36,2176.98) 2425.1,2176.98 2494.57,2107.51 2494.57,1878.17 2505.56,1867.18 U1.57@2505.56,1814.64
  Bottom Layer w6: v1(1215.83,2097.54) 1217.57,2095.79 1305.83,2095.79 1308.83,2095.79 ccw(c1308.83,2103.79) 1316.83,2103.79 1316.83,2106.9 cw(c1324.83,2106.9) 1332.83,2106.9 1332.83,2090.07 ccw(c1340.83,2090.07) 1348.83,2090.07 1348.83,2108.72 cw(c1356.83,2108.72) 1364.83,2108.72 1364.83,2090.07 ccw(c1372.83,2090.07) 1380.83,2090.07 1380.83,2108.72 cw(c1388.83,2108.72) 1396.83,2108.72 1396.83,2090.07 ccw(c1404.83,2090.07) 1412.83,2090.07 1412.83,2108.72 cw(c1420.83,2108.72) 1428.83,2108.72 1428.83,2094.17 ccw(c1436.83,2094.17) 1444.83,2094.17 1444.83,2103.79 cw(c1452.83,2103.79) 1460.83,2103.79 ccw(c1468.83,2103.79) 1468.83,2095.79 1510.67,2095.79 1519.62,2095.79 1534.41,2110.58 1849.62,2110.58 1867.69,2128.65 1867.69,2160.31 v1(1884.36,2176.98)
SDRAM_D10: U1.58 U13.45 | length 2607.6
  Top Layer w6: v1(1304.81,2128.14) 1305.12,2128.44 1407.09,2128.44 U13.45@1407.4,2128.75 ; v1(1835.12,2154.08) 1835.52,2154.49 1864.81,2154.49 1883.82,2154.49 cw(c1883.82,2146.49) 1891.82,2146.49 1891.82,2127.62 ccw(c1899.82,2127.62) 1907.82,2127.62 1907.82,2157.98 cw(c1915.82,2157.98) 1923.82,2157.98 1923.82,2125.96 ccw(c1931.82,2125.96) 1939.82,2125.96 1939.82,2157.98 cw(c1947.82,2157.98) 1955.82,2157.98 1955.82,2125.96 ccw(c1963.82,2125.96) 1971.82,2125.96 1971.82,2157.98 cw(c1979.82,2157.98) 1987.82,2157.98 1987.82,2125.96 ccw(c1995.82,2125.96) 2003.82,2125.96 2003.82,2157.98 cw(c2011.82,2157.98) 2019.82,2157.98 2019.82,2125.96 ccw(c2027.82,2125.96) 2035.82,2125.96 2035.82,2157.98 cw(c2043.82,2157.98) 2051.82,2157.98 2051.82,2125.96 ccw(c2059.82,2125.96) 2067.82,2125.96 2067.82,2157.98 cw(c2075.82,2157.98) 2083.82,2157.98 2083.82,2125.96 ccw(c2091.82,2125.96) 2099.82,2125.96 2099.82,2157.98 cw(c2107.82,2157.98) 2115.82,2157.98 2115.82,2125.96 ccw(c2123.82,2125.96) 2131.82,2125.96 2131.82,2157.98 cw(c2139.82,2157.98) 2147.82,2157.98 2147.82,2125.96 ccw(c2155.82,2125.96) 2163.82,2125.96 2163.82,2157.98 cw(c2171.82,2157.98) 2179.82,2157.98 2179.82,2125.96 ccw(c2187.82,2125.96) 2195.82,2125.96 2195.82,2157.98 cw(c2203.82,2157.98) 2211.82,2157.98 2211.82,2125.96 ccw(c2219.82,2125.96) 2227.82,2125.96 2227.82,2157.98 cw(c2235.82,2157.98) 2243.82,2157.98 2243.82,2125.96 ccw(c2251.82,2125.96) 2259.82,2125.96 2259.82,2157.98 cw(c2267.82,2157.98) 2275.82,2157.98 2275.82,2146.34 ccw(c2283.82,2146.34) 2291.82,2146.34 2291.82,2146.49 cw(c2299.82,2146.49) 2299.82,2154.49 2313.78,2154.49 2429.91,2154.49 2481.7,2102.71 2481.7,1875.36 2489.15,1867.9 2489.15,1829.95 2491.78,1827.32 U1.58@2491.78,1814.64
  Bottom Layer w6: v1(1304.81,2128.14) 1305.23,2127.72 1808.75,2127.72 v1(1835.12,2154.08)
SDRAM_D11: U1.89 U13.47 | length 2610.3
  Top Layer w6: v1(1253.46,2440.87) 1253.46,2225.61 1287.34,2191.74 U13.47@1407.4,2191.74 ; v1(2281.76,1442.43) 2319.87,1442.43 2332.82,1455.38 U1.89@2380.56,1455.38
  Bottom Layer w6: v1(1253.46,2440.87) 1282.36,2440.87 1285.36,2440.87 ccw(c1285.36,2448.87) 1293.36,2448.87 1293.36,2452.85 cw(c1301.36,2452.85) 1309.36,2452.85 1309.36,2438.99 ccw(c1317.36,2438.99) 1325.36,2438.99 1325.36,2450.67 cw(c1333.36,2450.67) 1341.36,2450.67 1341.36,2438.99 ccw(c1349.36,2438.99) 1357.36,2438.99 1357.36,2452.85 cw(c1365.36,2452.85) 1373.36,2452.85 1373.36,2438.99 ccw(c1381.36,2438.99) 1389.36,2438.99 1389.36,2452.24 cw(c1397.36,2452.24) 1405.36,2452.24 1405.36,2440.87 ccw(c1413.36,2440.87) 1421.36,2440.87 1421.36,2448.87 cw(c1429.36,2448.87) 1437.36,2448.87 ccw(c1445.36,2448.87) 1445.36,2440.87 1500.97,2440.87 2063.62,2440.87 2117.55,2386.94 2117.55,1940.77 2255.76,1802.55 2255.76,1646.19 2218.25,1608.68 2218.25,1505.94 v1(2281.76,1442.43)
SDRAM_D12: U1.60 U13.48 | length 2610.3
  Top Layer w6: v1(1284.33,2504.64) 1284.33,2244.7 1305.78,2223.24 U13.48@1407.4,2223.24 ; v1(2315.44,2112.52) 2419.36,2112.52 2459.7,2072.18 2459.7,1866.25 2464.22,1861.72 U1.60@2464.22,1814.64
  Bottom Layer w6: v1(1284.33,2504.64) 1320.4,2540.71 2222.78,2540.71 2275.87,2487.63 2275.87,2448.91 2275.87,2445.91 ccw(c2283.87,2445.91) 2283.87,2437.91 2286.5,2437.91 cw(c2286.5,2429.91) 2286.5,2421.91 2268.18,2421.91 ccw(c2268.18,2413.91) 2268.18,2405.91 2286.5,2405.91 cw(c2286.5,2397.91) 2286.5,2389.91 2268.18,2389.91 ccw(c2268.18,2381.91) 2268.18,2373.91 2286.5,2373.91 cw(c2286.5,2365.91) 2286.5,2357.91 2268.18,2357.91 ccw(c2268.18,2349.91) 2268.18,2341.91 2286.5,2341.91 cw(c2286.5,2333.91) 2286.5,2325.91 2268.18,2325.91 ccw(c2268.18,2317.91) 2268.18,2309.91 2286.5,2309.91 cw(c2286.5,2301.91) 2286.5,2293.91 2268.18,2293.91 ccw(c2268.18,2285.91) 2268.18,2277.91 2286.5,2277.91 cw(c2286.5,2269.91) 2286.5,2261.91 2268.18,2261.91 ccw(c2268.18,2253.91) 2268.18,2245.91 2281.84,2245.91 cw(c2281.84,2237.91) 2281.84,2229.91 2275.86,2229.91 ccw(c2275.86,2221.91) 2275.86,2213.91 2283.87,2213.91 cw(c2283.87,2205.91) 2283.87,2197.91 ccw(c2283.87,2189.91) 2275.87,2189.91 2275.87,2165.05 2275.87,2152.1 v1(2315.44,2112.52)
SDRAM_D13: U1.69 U13.50 | length 2610.3
  Top Layer w6: v1(1306.58,2487.7) 1306.58,2322.18 1342.54,2286.23 U13.50@1407.4,2286.23 ; v1(2188,1925.58) 2189.84,1923.74 2189.84,1914.17 2244.84,1859.18 2244.84,1824.3 2338.17,1730.98 U1.69@2380.56,1730.98
  Bottom Layer w6: v1(1306.58,2487.7) 1336.26,2517.38 1356.35,2517.38 1375.35,2517.38 cw(c1375.35,2509.38) 1383.35,2509.38 1383.35,2495.53 ccw(c1391.35,2495.53) 1399.35,2495.53 1399.35,2521.71 cw(c1407.35,2521.71) 1415.35,2521.71 1415.35,2495.53 ccw(c1423.35,2495.53) 1431.35,2495.53 1431.35,2521.71 cw(c1439.35,2521.71) 1447.35,2521.71 1447.35,2495.53 ccw(c1455.35,2495.53) 1463.35,2495.53 1463.35,2521.71 cw(c1471.35,2521.71) 1479.35,2521.71 1479.35,2495.53 ccw(c1487.35,2495.53) 1495.35,2495.53 1495.35,2521.71 cw(c1503.35,2521.71) 1511.35,2521.71 1511.35,2495.53 ccw(c1519.35,2495.53) 1527.35,2495.53 1527.35,2521.71 cw(c1535.35,2521.71) 1543.35,2521.71 1543.35,2495.53 ccw(c1551.35,2495.53) 1559.35,2495.53 1559.35,2521.71 cw(c1567.35,2521.71) 1575.35,2521.71 1575.35,2495.53 ccw(c1583.35,2495.53) 1591.35,2495.53 1591.35,2521.71 cw(c1599.35,2521.71) 1607.35,2521.71 1607.35,2495.53 ccw(c1615.35,2495.53) 1623.35,2495.53 1623.35,2521.71 cw(c1631.35,2521.71) 1639.35,2521.71 1639.35,2508.56 ccw(c1647.35,2508.56) 1655.35,2508.56 1655.35,2517.38 cw(c1663.35,2517.38) 1671.35,2517.38 1671.35,2509.38 ccw(c1679.35,2509.38) 1687.35,2509.38 cw(c1695.35,2509.38) 1695.35,2517.38 1719.38,2517.38 2060.06,2517.38 2156.36,2421.08 2156.36,1994.56 2188,1962.92 v1(2188,1925.58)
SDRAM_D14: U1.70 U13.51 | length 2610.3
  Top Layer w6: v1(1331.96,2476.53) 1333.49,2475 1333.49,2337.63 1353.39,2317.73 U13.51@1407.4,2317.73 ; v1(2162.21,1942.18) 2162.21,1923.53 2233.84,1851.9 2233.84,1819.75 2336.39,1717.2 U1.70@2380.56,1717.2
  Bottom Layer w6: v1(1331.96,2476.53) 1702.25,2476.53 1705.25,2476.53 ccw(c1705.25,2484.53) 1713.25,2484.53 1713.25,2498.38 cw(c1721.25,2498.38) 1729.25,2498.38 1729.25,2459.87 ccw(c1737.25,2459.87) 1745.25,2459.87 1745.25,2498.38 cw(c1753.25,2498.38) 1761.25,2498.38 1761.25,2459.87 ccw(c1769.25,2459.87) 1777.25,2459.87 1777.25,2498.38 cw(c1785.25,2498.38) 1793.25,2498.38 1793.25,2459.87 ccw(c1801.25,2459.87) 1809.25,2459.87 1809.25,2498.38 cw(c1817.25,2498.38) 1825.25,2498.38 1825.25,2459.87 ccw(c1833.25,2459.87) 1841.25,2459.87 1841.25,2498.38 cw(c1849.25,2498.38) 1857.25,2498.38 1857.25,2459.87 ccw(c1865.25,2459.87) 1873.25,2459.87 1873.25,2498.38 cw(c1881.25,2498.38) 1889.25,2498.38 1889.25,2459.87 ccw(c1897.25,2459.87) 1905.25,2459.87 1905.25,2498.38 cw(c1913.25,2498.38) 1921.25,2498.38 1921.25,2459.87 ccw(c1929.25,2459.87) 1937.25,2459.87 1937.25,2496.98 cw(c1945.25,2496.98) 1953.25,2496.98 1953.25,2468.53 ccw(c1961.25,2468.53) 1969.25,2468.53 cw(c1977.25,2468.53) 1977.25,2476.53 2013.6,2476.53 2072.34,2476.53 2137.23,2411.63 2137.23,1967.16 v1(2162.21,1942.18)
SDRAM_D15: U1.104 U13.53 | length 2610.4
  Top Layer w6: U13.53@1407.4,2380.72 1407.69,2380.43 1467.2,2380.43 v1(1505.24,2418.47) ; v1(2498.29,1296.75) 2498.29,1299.92 2505.56,1307.19 U1.104@2505.56,1330.38
  Bottom Layer w6: v1(1505.24,2418.47) 2041.84,2418.47 2095.5,2364.81 2095.5,1889.6 2110.77,1874.33 2112.89,1872.21 2124.2,1860.89 cw(c2118.55,1855.24) 2124.2,1849.58 2117.64,1843.01 ccw(c2123.3,1837.36) 2117.64,1831.7 ccw(c2123.3,1837.36) 2128.95,1831.7 2146.74,1849.49 cw(c2152.39,1843.83) 2158.05,1849.49 cw(c2152.39,1843.83) 2158.05,1838.17 2140.27,1820.39 ccw(c2145.92,1814.73) 2140.27,1809.07 ccw(c2145.92,1814.73) 2151.58,1809.07 2167.53,1825.02 cw(c2173.19,1819.37) 2178.84,1825.02 cw(c2173.19,1819.37) 2178.84,1813.71 2169.46,1804.32 ccw(c2175.11,1798.67) 2169.46,1793.01 ccw(c2175.11,1798.67) 2180.77,1793.01 cw(c2186.43,1787.35) 2192.09,1793.01 2213.63,1771.47 2215.75,1769.35 2243.24,1741.86 2243.24,1653.75 2204.22,1614.73 2204.22,1485.85 2271.92,1418.15 2274.04,1416.02 ccw(c2279.69,1421.68) 2285.35,1416.02 2304.96,1435.63 cw(c2310.62,1429.97) 2316.27,1435.63 cw(c2310.62,1429.97) 2316.27,1424.32 2296.67,1404.71 ccw(c2302.32,1399.05) 2296.67,1393.4 ccw(c2302.32,1399.05) 2307.98,1393.4 2327.59,1413 cw(c2333.24,1407.35) 2338.9,1413 cw(c2333.24,1407.35) 2338.9,1401.69 2319.29,1382.08 ccw(c2324.95,1376.43) 2319.29,1370.77 ccw(c2324.95,1376.43) 2330.61,1370.77 2350.21,1390.38 cw(c2355.87,1384.72) 2361.53,1390.38 cw(c2355.87,1384.72) 2361.53,1379.06 2341.92,1359.46 ccw(c2347.58,1353.8) 2341.92,1348.14 ccw(c2347.58,1353.8) 2353.23,1348.14 2372.84,1367.75 cw(c2378.5,1362.09) 2384.15,1367.75 cw(c2378.5,1362.09) 2384.15,1356.43 2364.55,1336.83 ccw(c2370.2,1331.17) 2364.55,1325.51 ccw(c2370.2,1331.17) 2375.86,1325.51 2395.47,1345.12 cw(c2401.13,1339.46) 2406.78,1345.12 cw(c2401.13,1339.46) 2406.78,1333.81 2387.18,1314.2 ccw(c2392.83,1308.54) 2387.18,1302.89 2393.25,1296.81 2406.63,1296.81 2498.24,1296.81 v1(2498.29,1296.75)
SDRAM_DQM1: R54.1 U13.39 | length 2186
  Top Layer w6: U13.39@1407.4,1939.77 1514.63,1939.77 1526.59,1927.81 1526.59,1899.05 v1(1527.65,1898) ; v1(2985.57,1156.13) 2985.57,1122.86 3018.9,1089.54 R54.1@3064.72,1089.51
  Bottom Layer w6: v1(1527.65,1898) 1540.84,1884.8 1923.6,1884.8 2078.32,1730.07 2126.68,1730.07 2150.44,1706.32 2150.44,1480.45 2435.72,1195.18 2607.49,1195.18 2656.06,1146.61 2948.47,1146.61 2957.99,1156.13 v1(2985.57,1156.13)
SDRAM_SDCKE0: U1.108 U13.37 | length 2610.4
  Top Layer w6: U13.37@1407.4,1876.78 1407.79,1876.39 1479.19,1876.39 1486.73,1883.93 v1(1486.73,1920.66) ; v1(2550.8,1269.9) 2550.8,1271.77 2560.68,1281.64 U1.108@2560.68,1330.38
  Bottom Layer w6: v1(1486.73,1920.66) 1569.67,1920.66 1588.67,1920.66 cw(c1588.67,1912.66) 1596.67,1912.66 1596.67,1903.8 ccw(c1604.67,1903.8) 1612.67,1903.8 1612.67,1921.13 cw(c1620.67,1921.13) 1628.67,1921.13 1628.67,1903.8 ccw(c1636.67,1903.8) 1644.67,1903.8 1644.67,1921.13 cw(c1652.67,1921.13) 1660.67,1921.13 1660.67,1903.8 ccw(c1668.67,1903.8) 1676.67,1903.8 1676.67,1921.13 cw(c1684.67,1921.13) 1692.67,1921.13 1692.67,1903.8 ccw(c1700.67,1903.8) 1708.67,1903.8 1708.67,1928.31 cw(c1716.67,1928.31) 1724.67,1928.31 1724.67,1903.8 ccw(c1732.67,1903.8) 1740.67,1903.8 1740.67,1928.31 cw(c1748.67,1928.31) 1756.67,1928.31 1756.67,1903.8 ccw(c1764.67,1903.8) 1772.67,1903.8 1772.67,1932.22 cw(c1780.67,1932.22) 1788.67,1932.22 1788.67,1903.8 ccw(c1796.67,1903.8) 1804.67,1903.8 1804.67,1954.52 cw(c1812.67,1954.52) 1820.67,1954.52 1820.67,1903.8 ccw(c1828.67,1903.8) 1836.67,1903.8 1836.67,1979.96 cw(c1844.67,1979.96) 1852.67,1979.96 1852.67,1903.8 ccw(c1860.67,1903.8) 1868.67,1903.8 1868.67,1979.96 cw(c1876.67,1979.96) 1884.67,1979.96 1884.67,1903.8 ccw(c1892.67,1903.8) 1900.67,1903.8 1900.67,1951.22 cw(c1908.67,1951.22) 1916.67,1951.22 1916.67,1927.32 ccw(c1924.67,1927.32) 1919.01,1921.66 1963.39,1877.28 2095.55,1745.13 2144.63,1745.13 2166.13,1723.63 2166.13,1485.06 2401.17,1250.02 2489.57,1250.02 2509.46,1269.9 v1(2550.8,1269.9)
SDRAM_SDCLK: R11.1 U13.38 | length 2217.2
  Top Layer w6: v1(1356.67,1908.7) 1356.88,1908.49 1408.95,1908.49 U13.38@1409.1,1908.33 ; R11.1@2095.96,1702.71 2096.38,1702.3 v1(2121.86,1702.3)
  Bottom Layer w6: v1(1356.67,1908.7) 1356.67,1852.49 1370.2,1838.97 1377.86,1838.97 1407.88,1838.97 ccw(c1407.88,1847.97) 1416.88,1847.97 cw(c1425.88,1847.97) 1434.88,1847.97 1434.88,1823.52 ccw(c1443.88,1823.52) 1452.88,1823.52 1452.88,1857.27 cw(c1461.88,1857.27) 1470.88,1857.27 1470.88,1821.65 ccw(c1479.88,1821.65) 1488.88,1821.65 1488.88,1857.27 cw(c1497.88,1857.27) 1506.88,1857.27 1506.88,1821.65 ccw(c1515.88,1821.65) 1524.88,1821.65 1524.88,1857.27 cw(c1533.88,1857.27) 1542.88,1857.27 1542.88,1821.65 ccw(c1551.88,1821.65) 1560.88,1821.65 1560.88,1857.27 cw(c1569.88,1857.27) 1578.88,1857.27 1578.88,1821.65 ccw(c1587.88,1821.65) 1596.88,1821.65 1596.88,1857.27 cw(c1605.88,1857.27) 1614.88,1857.27 1614.88,1821.65 ccw(c1623.88,1821.65) 1632.88,1821.65 1632.88,1857.27 cw(c1641.88,1857.27) 1650.88,1857.27 1650.88,1821.65 ccw(c1659.88,1821.65) 1668.88,1821.65 1668.88,1857.27 cw(c1677.88,1857.27) 1686.88,1857.27 1686.88,1821.65 ccw(c1695.88,1821.65) 1704.88,1821.65 1704.88,1857.27 cw(c1713.88,1857.27) 1722.88,1857.27 1722.88,1821.65 ccw(c1731.88,1821.65) 1740.88,1821.65 1740.88,1857.27 cw(c1749.88,1857.27) 1758.88,1857.27 1758.88,1821.65 ccw(c1767.88,1821.65) 1776.88,1821.65 1776.88,1857.27 cw(c1785.88,1857.27) 1794.88,1857.27 1794.88,1821.65 ccw(c1803.88,1821.65) 1812.88,1821.65 1812.88,1857.27 cw(c1821.88,1857.27) 1830.88,1857.27 1830.88,1821.65 ccw(c1839.88,1821.65) 1848.88,1821.65 1848.88,1857.27 cw(c1857.88,1857.27) 1866.88,1857.27 1866.88,1821.65 ccw(c1875.88,1821.65) 1884.88,1821.65 1884.88,1857.27 cw(c1893.88,1857.27) 1902.88,1857.27 1902.88,1821.65 ccw(c1911.88,1821.65) 1920.88,1821.65 1920.88,1829.97 cw(c1929.88,1829.97) 1929.88,1838.97 1932.88,1838.97 1950.15,1838.97 2086.82,1702.3 v1(2121.86,1702.3)